# Altium PCB beagleplay-u11-owned-designator.PcbDoc
Units mm, origin at the board's own origin, x right, y up, seen from the top; angles counter-clockwise.
Board outline 9.06 x 11.51 mm, 2 copper layers (Top, Bottom), stack 0 mm thick; 1 components, 8 nets, 8 pads, 0 vias.
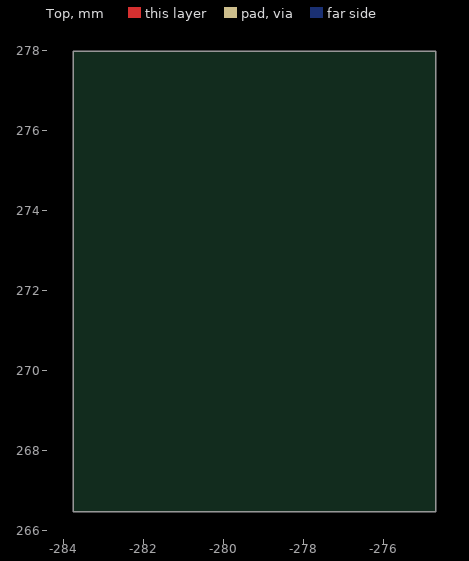
[diagram p0: Top view]
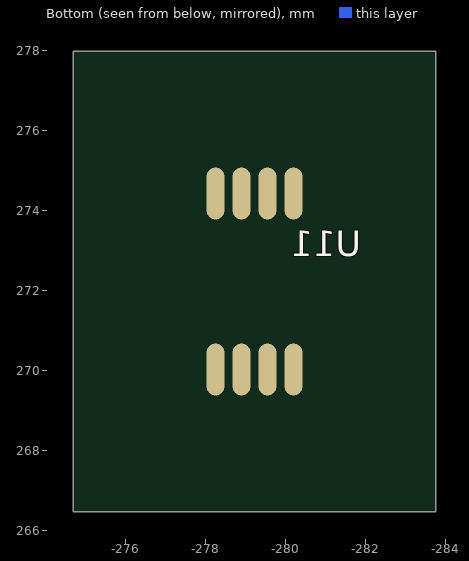
[diagram p1: Bottom view, seen from below]

## Layer stack, top to bottom

## Board outline
-283.754,266.465 -274.692,266.465 -274.692,277.977 -283.754,277.977

## Components (designator, comment, footprint, x,y, rotation, side; value= is the part's Value field where it differs from the comment)
U11 "" VSSOP8_0D65_3X3X1_1MM -279.223,272.221 r0 bottom

## Footprints (in the part's own frame and the unit in brackets; to place one, negate y for a bottom-side part, rotate by r counter-clockwise, add the part's x,y. Pads: shape width x height; smd on the part's side, far side on the other; paste and mask are expansions set on the pad)
VSSOP8_0D65_3X3X1_1MM [mm] "VSSOP8_0D65_3X3X1_1MM"
  oval 0.45x1.3 smd: 1(-0.975,-2.2) 2(-0.325,-2.2) 3(0.325,-2.2) 4(0.975,-2.2) 5(0.975,2.2) 6(0.325,2.2) 7(-0.325,2.2) 8(-0.975,2.2)

## Nets (pads, with @x,y where several pads share a name; then routed paths per layer and width w, separated by ;. In a path a pad name is that pad's centre, name@x,y a point inside that pad or via, vN(x,y) a via of type N, cw(c..) or ccw(c..) an arc to the next point about the centre after c; other vN are vias at no path point)
GND: U11.3
MCU_SPI1_CLK: U11.8
MCU_SPI1_CS1: U11.1
MCU_SPI1_D0: U11.7
MCU_SPI1_D1: U11.6
N16149634: U11.4
N16149646: U11.5
VDD_3V3A: U11.2